# Altium PCB MainBoardPCB.PcbDoc (part 11 of 50)
Units mm, origin at the board's own origin, x right, y up, seen from the top; angles counter-clockwise.
Board outline 258.95 x 308.86 mm, 16 copper layers (L1, L2 (GND), L3 (Sign), L4 (GND), L5 (Sign), L6 (PWR/GND), L7(12V+Other), L8 (Plane_GND), L9 (PWR/GND), L10 (3V3+Other), L11 (PWR/GND), L12 (Sign), L13 (GND), L14 (Sign), L15 (GND), L16), stack 2.503 mm thick; 2578 components, 1867 nets, 8817 pads, 8021 vias.
Unrouted connection lines stored in the file: 25.
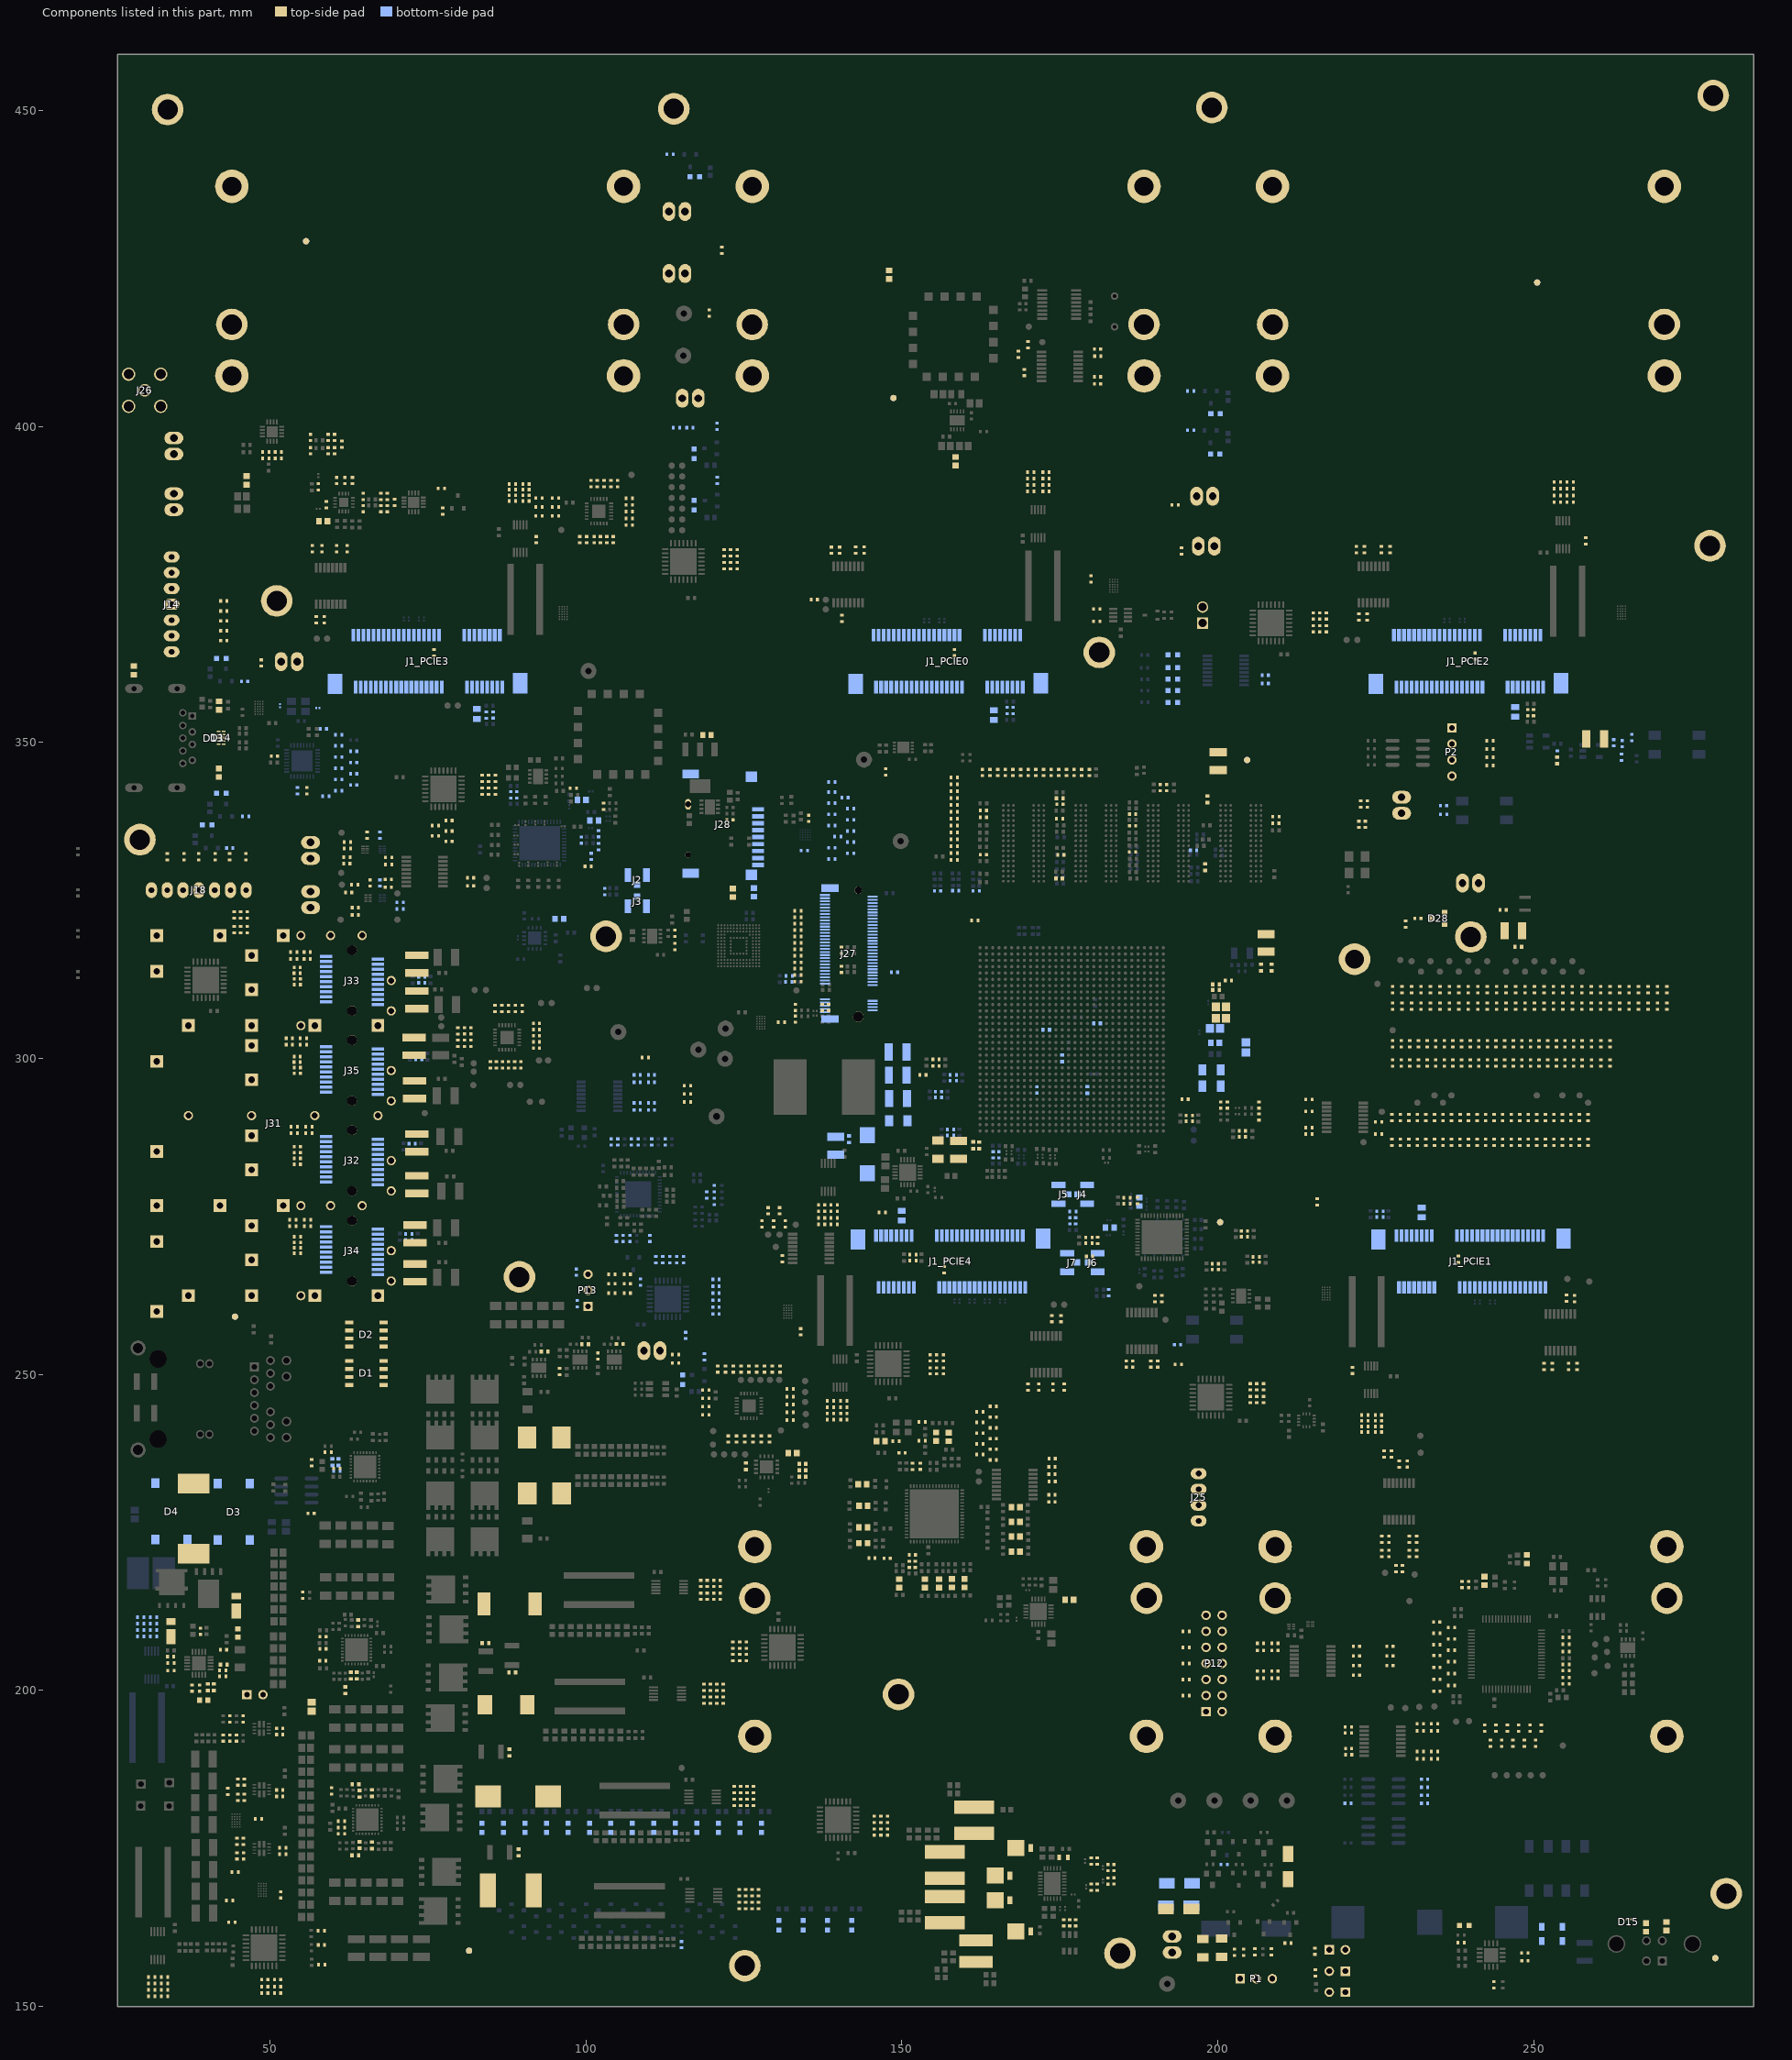
[diagram p22: the components of this part, seen from the top]

## Part data (continued)
D11 D12: "DIODE SCHOTTKY 30V 200MA SOD123", Average Rectified Current=200mA, Capacitance=10pF, Case/Package=SOD-123-2, Forward Voltage=350mV, Manufacturer="ON Semiconductor", Max Forward Surge Current (Ifsm)=600mA, Max Operating Temperature=125°C, Max Repetitive Reverse Voltage (Vrrm)=30V, Max Reverse Leakage Current=2uA, Min Operating Temperature=-55°C, Package Quantity=3000, Power Dissipation=400mW, Supplier Part Number 1=BAT54T1GOSCT-ND, Category="Rectifier Diodes", ComponentLink1Description=https://datasheet.ciiva.com/915/bat54t1-d-915482.pdf?src-supplier=Farnell, ComponentLink1URL=https://datasheet.ciiva.com/915/bat54t1-d-915482.pdf?src-supplier=Farnell, ComponentLink2Description=https://datasheet.ciiva.com/915/bat54t1-d-915482.pdf?src-supplier=Digi-Key, ComponentLink2URL=https://datasheet.ciiva.com/915/bat54t1-d-915482.pdf?src-supplier=Digi-Key, ComponentLink3Description=https://datasheet.ciiva.com/4714/bat54t1-d-108887-4714899.pdf?src-supplier=Mouser, ComponentLink3URL=https://datasheet.ciiva.com/4714/bat54t1-d-108887-4714899.pdf?src-supplier=Mouser, ComponentLink4Description=https://datasheet.ciiva.com/15144/getdatasheetpartid-39113-15144061.pdf?src-supplier=Verical, ComponentLink4URL=https://datasheet.ciiva.com/15144/getdatasheetpartid-39113-15144061.pdf?src-supplier=Verical, ComponentLink5Description=https://datasheet.ciiva.com/1180/bat54t1-d-1180308.pdf?src-supplier=Element14, ComponentLink5URL=https://datasheet.ciiva.com/1180/bat54t1-d-1180308.pdf?src-supplier=Element14, ComponentLink6Description=https://datasheet.ciiva.com/8299/bat54t1-d-8299989.pdf?src-supplier=Avnet, ComponentLink6URL=https://datasheet.ciiva.com/8299/bat54t1-d-8299989.pdf?src-supplier=Avnet, ComponentLink7Description=https://datasheet.ciiva.com/16475/bat54t1-d-16475623.pdf?src-supplier=Avnet+Asia, ComponentLink7URL=https://datasheet.ciiva.com/16475/bat54t1-d-16475623.pdf?src-supplier=Avnet+Asia, ComponentLink8Description=https://datasheet.ciiva.com/25950/bat54t1-d-25950154.pdf?src-supplier=Avnet+Europe, ComponentLink8URL=https://datasheet.ciiva.com/25950/bat54t1-d-25950154.pdf?src-supplier=Avnet+Europe, ComponentLink9Description=https://datasheet.ciiva.com/915/bat54t1-d-915483.pdf?src-supplier=Digi-Key, ComponentLink9URL=https://datasheet.ciiva.com/915/bat54t1-d-915483.pdf?src-supplier=Digi-Key, ComponentLink10Description=https://datasheet.ciiva.com/915/bat54t1-d-915484.pdf?src-supplier=Digi-Key, ComponentLink10URL=https://datasheet.ciiva.com/915/bat54t1-d-915484.pdf?src-supplier=Digi-Key, Contact Plating=Tin,Matte, Current Rating=200mA, Element Configuration=Single, Forward Current=200mA, Height=1.12mm, Lead Free="Lead Free", Length=2.69mm, Manufacturer Part Number=BAT54T1G, Max Reverse Voltage (DC)=30V, Max Surge Current=600mA, Number of Pins=2, Output Current=200mA, Packaging="Tape and Reel", Peak Non-Repetitive Surge Current=600mA, Peak Reverse Current=2uA, Polarity=Standard, Pricing 1="1=0,27000, 10=0,21700, 100=0,08880, 500=0,07410, 1000=0,05148 (USD)", Radiation Hardening=No, REACH SVHC="No SVHC", Recovery Time=5ns, Reverse Recovery Time=5ns, RoHS=Yes, Stock 1=20103, Supplier 1=Digi-Key, Termination=SMD/SMT, Voltage Rating (DC)=30V, Width=1.6mm
D13 D15: "TVS DIODE 5.5V 8V SOT3", Breakdown Voltage=9V, Capacitance=0.8pF, Case/Package=SOT, Clamping Voltage=8V, Manufacturer="Texas Instruments", Max Operating Temperature=85°C, Min Operating Temperature=-40°C, Package Quantity=1, Peak Pulse Current=1A, Peak Pulse Power=45W, Power Line Protection=Yes, Reverse Standoff Voltage=5.5V, Supplier Part Number 1=296-25509-1-ND, Test Current=1mA, Category="Interface ICs", ComponentLink1Description=https://datasheet.ciiva.com/1611/tpd2eusb30-1611602.pdf?src-supplier=Newark, ComponentLink1URL=https://datasheet.ciiva.com/1611/tpd2eusb30-1611602.pdf?src-supplier=Newark, ComponentLink2Description=https://datasheet.ciiva.com/15134/getdatasheetpartid-202713-15134479.pdf?src-supplier=Verical, ComponentLink2URL=https://datasheet.ciiva.com/15134/getdatasheetpartid-202713-15134479.pdf?src-supplier=Verical, ComponentLink3Description=https://datasheet.ciiva.com/26787/tpd2eusb30drtr-26787652.pdf?src-supplier=IIIC, ComponentLink3URL=https://datasheet.ciiva.com/26787/tpd2eusb30drtr-26787652.pdf?src-supplier=IIIC, ComponentLink4Description=https://datasheet.ciiva.com/353/tpd2eusb30-353272.pdf?src-supplier=Digi-Key, ComponentLink4URL=https://datasheet.ciiva.com/353/tpd2eusb30-353272.pdf?src-supplier=Digi-Key, ComponentLink5Description=https://datasheet.ciiva.com/1504/1882087-1504248.pdf?src-supplier=Element14, ComponentLink5URL=https://datasheet.ciiva.com/1504/1882087-1504248.pdf?src-supplier=Element14, ComponentLink6Description=https://datasheet.ciiva.com/353/tpd2eusb30-353273.pdf?src-supplier=Digi-Key, ComponentLink6URL=https://datasheet.ciiva.com/353/tpd2eusb30-353273.pdf?src-supplier=Digi-Key, ComponentLink7Description=https://datasheet.ciiva.com/25956/tpd4eusb30-25956841.pdf?src-supplier=Avnet+Europe, ComponentLink7URL=https://datasheet.ciiva.com/25956/tpd4eusb30-25956841.pdf?src-supplier=Avnet+Europe, ComponentLink8Description=https://datasheet.ciiva.com/353/tpd2eusb30-353274.pdf?src-supplier=Digi-Key, ComponentLink8URL=https://datasheet.ciiva.com/353/tpd2eusb30-353274.pdf?src-supplier=Digi-Key, Depth=0.8mm, Direction=Unidirectional,Bidirectional, Element Configuration=Dual, ESD Protection=Yes, Height=0.45mm, Interface=USB, Lead Free="Lead Free", Length=1mm, Manufacturer Part Number=TPD2EUSB30DRTR, Min Breakdown Voltage=9V, Number of Bidirectional Channels=2, Number of Channels=2, Number of Pins=3, Packaging="Tape and Reel", Pricing 1="1=0,58000, 10=0,49400, 25=0,46160, 100=0,34280, 250=0,32564, 500=0,26764, 1000=0,21754 (USD)", Radiation Hardening=No, REACH SVHC="No SVHC", RoHS=Yes, Stock 1=293674, Supplier 1=Digi-Key, Width=0.85mm, Working Voltage=5.5V
D14: "TVS DIODE 5.5V 8V 10SON", Breakdown Voltage=7V, Capacitance=0.8pF, Clamping Voltage=8V, Current Rating=5A, Manufacturer="Texas Instruments", Max Operating Temperature=85°C, Min Operating Temperature=-40°C, Package Quantity=1, Peak Pulse Current=1A, Peak Pulse Power=45W, Power Line Protection=Yes, Reverse Standoff Voltage=5.5V, Supplier Part Number 1=296-28063-1-ND, Category="TVS Diodes", ComponentLink1Description=https://datasheet.ciiva.com/339/tpd4eusb30-339202.pdf?src-supplier=Digi-Key, ComponentLink1URL=https://datasheet.ciiva.com/339/tpd4eusb30-339202.pdf?src-supplier=Digi-Key, ComponentLink2Description=https://datasheet.ciiva.com/41659/1634000-41659268.pdf?src-supplier=Farnell, ComponentLink2URL=https://datasheet.ciiva.com/41659/1634000-41659268.pdf?src-supplier=Farnell, ComponentLink3Description=https://datasheet.ciiva.com/15134/getdatasheetpartid-299321-15134669.pdf?src-supplier=Verical, ComponentLink3URL=https://datasheet.ciiva.com/15134/getdatasheetpartid-299321-15134669.pdf?src-supplier=Verical, ComponentLink4Description=https://datasheet.ciiva.com/339/tpd4eusb30-339204.pdf?src-supplier=Digi-Key, ComponentLink4URL=https://datasheet.ciiva.com/339/tpd4eusb30-339204.pdf?src-supplier=Digi-Key, ComponentLink5Description=https://datasheet.ciiva.com/1504/1882087-1504249.pdf?src-supplier=Element14, ComponentLink5URL=https://datasheet.ciiva.com/1504/1882087-1504249.pdf?src-supplier=Element14, ComponentLink6Description=https://datasheet.ciiva.com/339/tpd4eusb30-339203.pdf?src-supplier=Digi-Key, ComponentLink6URL=https://datasheet.ciiva.com/339/tpd4eusb30-339203.pdf?src-supplier=Digi-Key, ComponentLink7Description=https://datasheet.ciiva.com/22621/1882087-22621482.pdf?src-supplier=Element14, ComponentLink7URL=https://datasheet.ciiva.com/22621/1882087-22621482.pdf?src-supplier=Element14, Data Rate=6Gbps, Depth=1mm, Direction=Unidirectional, ESD Protection=Yes, Height=0.5mm, Interface=USB, Lead Free="Lead Free", Length=2.5mm, Manufacturer Part Number=TPD4EUSB30DQAR, Min Breakdown Voltage=8V, Number of Bidirectional Channels=4, Number of Channels=4, Number of Pins=10, Packaging="Tape and Reel", Pricing 1="1=0,81000, 10=0,71400, 25=0,67040, 100=0,48670, 250=0,46936, 500=0,40664, 1000=0,34608 (USD)", Radiation Hardening=No, REACH SVHC="No SVHC", RoHS=Yes, Stock 1=69157, Supplier 1=Digi-Key, Termination=SMD/SMT, Width=1.1mm, Working Voltage=5.5V
D16 D17 D18 D19: library part MBRM140T1G, Supplier Part Number 1=MBRM140T3GOSCT-ND, Supplier 1=Digi-Key
D20 D21 D23 D24: "DIODE GEN PURP 1KV 1A SMA", Average Rectified Current=1A, Capacitance=10pF, Case/Package=SMA, Forward Voltage="Vf = 1.1V", Manufacturer=Diodes, Max Forward Surge Current (Ifsm)=30A, Max Operating Temperature=150°C, Max Repetitive Reverse Voltage (Vrrm)=1kV, Min Operating Temperature=-65°C, Package Quantity=5000, Peak Reverse Current=5uA, Supplier Part Number 1=S1M-FDICT-ND, Category="Rectifier Diodes", ComponentLink1Description=https://datasheet.ciiva.com/34302/1541642-34302418.pdf?src-supplier=Jameco, ComponentLink1URL=https://datasheet.ciiva.com/34302/1541642-34302418.pdf?src-supplier=Jameco, ComponentLink2Description=https://datasheet.ciiva.com/22695/1911706-22695834.pdf?src-supplier=Element14, ComponentLink2URL=https://datasheet.ciiva.com/22695/1911706-22695834.pdf?src-supplier=Element14, Current Rating=1A, Forward Current=1A, Height=2.1mm, Lead Free="Lead Free", Length=4.6mm, Manufacturer Part Number=S1M-13-F, Max Reverse Voltage (DC)=1kV, Number of Pins=2, Output Current=1A, Packaging="Tape and Reel", Peak Non-Repetitive Surge Current=30A, Polarity=Standard, Pricing 1="1=0,25000, 10=0,20100, 25=0,16840, 100=0,08240, 250=0,08104, 500=0,06870, 1000=0,04774, 2500=0,04437 (USD)", Radiation Hardening=No, REACH SVHC="No SVHC", Recovery Time=1.8us, Reverse Recovery Time=3us, Reverse Voltage (DC)=1kV, RoHS=Yes, Stock 1=1021310, Supplier 1=Digi-Key, Termination=SMD/SMT, Voltage Rating (DC)=1kV, Weight=0.002258oz, Width=2.92mm
D22 D25 D29 D30 D31 D32 D33 D34 D35 D36 D37 D38 D39 D40 D41 D42 D43 D44 D45 D46 D47 D48 D49 D50 D51 D52 D53: "LED,  LTST-C190GKT", Case Code (Imperial)=0603, Case Code (Metric)=1608, Color=Green, Forward Current=30mA, Forward Voltage=2.1V, Lens Color=Colorless, Manufacturer 1="Vishay Lite-On", Max Operating Temperature=85°C, Min Operating Temperature=-55°C, Package Quantity=1, Power Dissipation=100mW, Reverse Voltage=5V, Supplier Part Number 1=160-1183-1-ND, Test Current=10mA, Voltage=2V, Case/Package=0603, ComponentLink1Description=https://datasheet.ciiva.com/11775/0900766b80dc02a6-11775616.pdf?src-supplier=RSComponents, ComponentLink1URL=https://datasheet.ciiva.com/11775/0900766b80dc02a6-11775616.pdf?src-supplier=RSComponents, ComponentLink2Description=https://datasheet.ciiva.com/2109/ltst-c190gkt-2109985.pdf?src-supplier=Digi-Key, ComponentLink2URL=https://datasheet.ciiva.com/2109/ltst-c190gkt-2109985.pdf?src-supplier=Digi-Key, ComponentLink3Description=https://datasheet.ciiva.com/16392/lite-on20ltst-c190gkt-16392818.pdf?src-supplier=Future+Electronics, ComponentLink3URL=https://datasheet.ciiva.com/16392/lite-on20ltst-c190gkt-16392818.pdf?src-supplier=Future+Electronics, ComponentLink4Description=https://datasheet.ciiva.com/12403/lite-on-ltst-c190gkt-187204-12403884.pdf?src-supplier=Mouser, ComponentLink4URL=https://datasheet.ciiva.com/12403/lite-on-ltst-c190gkt-187204-12403884.pdf?src-supplier=Mouser, ComponentLink5Description=https://datasheet.ciiva.com/2109/ltst-c190gkt-2109986.pdf?src-supplier=Digi-Key, ComponentLink5URL=https://datasheet.ciiva.com/2109/ltst-c190gkt-2109986.pdf?src-supplier=Digi-Key, ComponentLink6Description=https://datasheet.ciiva.com/2109/ltst-c190gkt-2109987.pdf?src-supplier=Digi-Key, ComponentLink6URL=https://datasheet.ciiva.com/2109/ltst-c190gkt-2109987.pdf?src-supplier=Digi-Key, Depth=0.8mm, Dominant Wavelength=569nm, Height=0.8mm, Illumination Color=Green, Lead Free="Lead Free", Length=1.6mm, Lens Style=Clear,Diffused,Colorless,Rectangular, Lens Transparency=Clear, Luminous Intensity=6mcd, Manufacturer Part Number 1=LTST-C190GKT, Mount="Surface Mount", Number of Elements=1, Number of LEDs=1, Number of Pins=2, Packaging="Tape and Reel", Power Rating=100mW, Pricing 1="1=0.26000, 10=0.18800, 100=0.08880, 500=0.05922, 1000=0.04639 (USD)", Radiation Hardening=No, RoHS=Yes, Stock 1=908158, Supplier 1=Digi-Key, Viewing Angle=130°, Wavelength=565nm, Width=0.8mm
D26 D27: "DIODE SCHOTTKY 100V POWERDI123", Average Rectified Current=1A, Capacitance=36pF, Forward Voltage=770mV, Manufacturer=Diodes, Max Forward Surge Current (Ifsm)=40A, Max Operating Temperature=175°C, Max Repetitive Reverse Voltage (Vrrm)=100V, Min Operating Temperature=-55°C, Package Quantity=3000, Peak Non-Repetitive Surge Current=50A, Peak Reverse Current=1uA, Supplier Part Number 1=DFLS1100DICT-ND, Category="Rectifier Diodes", ComponentLink1Description=https://datasheet.ciiva.com/6932/ds30497-6932064.pdf?src-supplier=Newark, ComponentLink1URL=https://datasheet.ciiva.com/6932/ds30497-6932064.pdf?src-supplier=Newark, ComponentLink2Description=https://datasheet.ciiva.com/4715/ds30497-81105-4715653.pdf?src-supplier=Mouser, ComponentLink2URL=https://datasheet.ciiva.com/4715/ds30497-81105-4715653.pdf?src-supplier=Mouser, ComponentLink3Description=https://datasheet.ciiva.com/4245/2460ds30497-4245287.pdf?src-supplier=Arrow, ComponentLink3URL=https://datasheet.ciiva.com/4245/2460ds30497-4245287.pdf?src-supplier=Arrow, ComponentLink4Description=https://datasheet.ciiva.com/15144/getdatasheetpartid-44146-15144126.pdf?src-supplier=Verical, ComponentLink4URL=https://datasheet.ciiva.com/15144/getdatasheetpartid-44146-15144126.pdf?src-supplier=Verical, ComponentLink5Description=https://datasheet.ciiva.com/26788/dfls1100-7-26788776.pdf?src-supplier=IIIC, ComponentLink5URL=https://datasheet.ciiva.com/26788/dfls1100-7-26788776.pdf?src-supplier=IIIC, ComponentLink6Description=https://datasheet.ciiva.com/914/ds30497-914548.pdf?src-supplier=Digi-Key, ComponentLink6URL=https://datasheet.ciiva.com/914/ds30497-914548.pdf?src-supplier=Digi-Key, ComponentLink7Description=https://datasheet.ciiva.com/914/ds30497-914549.pdf?src-supplier=Digi-Key, ComponentLink7URL=https://datasheet.ciiva.com/914/ds30497-914549.pdf?src-supplier=Digi-Key, ComponentLink8Description=https://datasheet.ciiva.com/914/ds30497-914550.pdf?src-supplier=Digi-Key, ComponentLink8URL=https://datasheet.ciiva.com/914/ds30497-914550.pdf?src-supplier=Digi-Key, ComponentLink9Description=https://datasheet.ciiva.com/7964/ds30497-7964246.pdf?src-supplier=Element14, ComponentLink9URL=https://datasheet.ciiva.com/7964/ds30497-7964246.pdf?src-supplier=Element14, ComponentLink10Description=https://datasheet.ciiva.com/22695/1915475-22695803.pdf?src-supplier=Element14, ComponentLink10URL=https://datasheet.ciiva.com/22695/1915475-22695803.pdf?src-supplier=Element14, Current Rating=1A, Element Configuration=Single, Forward Current=1A, Height=0.98mm, Lead Free="Lead Free", Length=2.8mm, Manufacturer Part Number=DFLS1100-7, Max Reverse Voltage (DC)=100V, Mount="Surface Mount", Number of Pins=2, Output Current=1A, Packaging="Tape and Reel", Polarity=Standard, Pricing 1="1=0,41000, 10=0,35100, 25=0,32760, 100=0,24340, 250=0,23120, 500=0,19000, 1000=0,15444 (USD)", Radiation Hardening=No, REACH SVHC="No SVHC", RoHS=Yes, Stock 1=113187, Supplier 1=Digi-Key, Termination=SMD/SMT, Voltage Rating (DC)=100V, Width=1.78mm
D28: "DIODE ARRAY SCHOTTKY 40V SOT23", Average Rectified Current=200mA, Capacitance=5pF, Case/Package=SOT-23, Forward Voltage=1V, Manufacturer=MCC, Max Forward Surge Current (Ifsm)=600mA, Max Operating Temperature=125°C, Max Repetitive Reverse Voltage (Vrrm)=40V, Max Reverse Leakage Current=200nA, Min Operating Temperature=-55°C, Package Quantity=3000, Power Dissipation=200mW, Supplier Part Number 1=BAS40-04TPMSCT-ND, ComponentLink1Description=https://datasheet.ciiva.com/23684/1684803-23684306.pdf?src-supplier=Newark, ComponentLink1URL=https://datasheet.ciiva.com/23684/1684803-23684306.pdf?src-supplier=Newark, ComponentLink2Description=https://datasheet.ciiva.com/4716/bas40-bas70sot-23-28891-4716000.pdf?src-supplier=Mouser, ComponentLink2URL=https://datasheet.ciiva.com/4716/bas40-bas70sot-23-28891-4716000.pdf?src-supplier=Mouser, ComponentLink3Description=https://datasheet.ciiva.com/906/bas40-bas70sot-23-906320.pdf?src-supplier=Digi-Key, ComponentLink3URL=https://datasheet.ciiva.com/906/bas40-bas70sot-23-906320.pdf?src-supplier=Digi-Key, ComponentLink4Description=https://datasheet.ciiva.com/15200/getdatasheetpartid-226544-15200426.pdf?src-supplier=Verical, ComponentLink4URL=https://datasheet.ciiva.com/15200/getdatasheetpartid-226544-15200426.pdf?src-supplier=Verical, ComponentLink5Description=https://datasheet.ciiva.com/7624/1684803-7624699.pdf?src-supplier=Element14, ComponentLink5URL=https://datasheet.ciiva.com/7624/1684803-7624699.pdf?src-supplier=Element14, ComponentLink6Description=https://datasheet.ciiva.com/906/bas40-bas70sot-23-906318.pdf?src-supplier=Digi-Key, ComponentLink6URL=https://datasheet.ciiva.com/906/bas40-bas70sot-23-906318.pdf?src-supplier=Digi-Key, ComponentLink7Description=https://datasheet.ciiva.com/906/bas40-bas70sot-23-906319.pdf?src-supplier=Digi-Key, ComponentLink7URL=https://datasheet.ciiva.com/906/bas40-bas70sot-23-906319.pdf?src-supplier=Digi-Key, Element Configuration=Single, Forward Current=200mA, Height=1.02mm, Lead Free="Lead Free", Length=3.04mm, Manufacturer Part Number=BAS40-04-TP, Max Reverse Voltage (DC)=40V, Max Surge Current=600mA, Mount="Surface Mount", Number of Pins=3, Packaging="Tape and Reel", Peak Non-Repetitive Surge Current=600mA, Peak Reverse Current=200nA, Pricing 1="1 = 0,39000, 10 = 0,28800, 25 = 0,25240, 100 = 0,13700, 250 = 0,13628, 500 = 0,11176, 1000 = 0,08292 (USD)", Radiation Hardening=No, REACH SVHC=Unknown, Recovery Time=5ns, Reverse Recovery Time=5ns, RoHS=Yes, Stock 1=1204011, Supplier 1=Digi-Key, Width=1.4mm
F1_PCIE0 F1_PCIE1 F1_PCIE2 F1_PCIE3 F1_PCIE4: library part Resistor, "FUSE BOARD MNT 500MA 32VDC 0805", Case/Package=SMD/SMT, Case Code (Imperial)=0805, Case Code (Metric)=2012, Current Rating=500mA, DC Cold Resistance=570mR, Manufacturer=Vishay, Manufacturer Part Number=MFU0805FF00500P100, Max Operating Temperature=125°C, Min Operating Temperature=-55°C, Package Quantity=1000, Supplier Part Number 1=MFU0805.50CT-ND, Voltage Rating (DC)=32V, Approvals=UL, Category=Fuses, ComponentLink1Description=https://datasheet.ciiva.com/7650/mfuserie-7650777.pdf?src-supplier=Element14, ComponentLink1URL=https://datasheet.ciiva.com/7650/mfuserie-7650777.pdf?src-supplier=Element14, ComponentLink2Description=https://datasheet.ciiva.com/16393/mfuserie-16393883.pdf?src-supplier=Future+Electronics, ComponentLink2URL=https://datasheet.ciiva.com/16393/mfuserie-16393883.pdf?src-supplier=Future+Electronics, ComponentLink3Description=https://datasheet.ciiva.com/8057/1480005-8057902.pdf?src-supplier=Element14, ComponentLink3URL=https://datasheet.ciiva.com/8057/1480005-8057902.pdf?src-supplier=Element14, ComponentLink4Description=https://datasheet.ciiva.com/11337/mfuserie-11337759.pdf?src-supplier=Avnet, ComponentLink4URL=https://datasheet.ciiva.com/11337/mfuserie-11337759.pdf?src-supplier=Avnet, Depth=1.25mm, Fuse Current=500mA, Fuse Type="Board Mount (Cartridge Style Excluded)", Height=0.018inch, Housing Material=Ceramic, Length=0.079inch, Mount="Surface Mount", Number of Pins=2, Packaging="Tape and Reel", Pricing 1="1=0,63000, 5=0,60800, 10=0,58900, 50=0,49560, 100=0,41140, 250=0,37400, 500=0,31790 (USD)", Radiation Hardening=No, REACH SVHC="No SVHC", RoHS=Yes, Stock 1=14752, Supplier 1=Digi-Key, Width=0.049inch, Working Voltage=32V
FB3 FB5 FB6 FB7 FB26 FB27 FB28 FB29 FB31 FB32 FB35 FB43 FB44: library part Ferrite, "FERRITE BEAD 220 OHM 0603 1LN", Case/Package=0603, Case Code (Metric)=1608, Current Rating=2.5A, DC Resistance (DCR)=40mR, Manufacturer=Murata, Manufacturer Part Number=BLM18SG221TN1D, Max Operating Temperature=125°C, Min Operating Temperature=-55°C, Package Quantity=1, Supplier Part Number 1=490-5225-1-ND, Test Frequency=100MHz, Tolerance=25%, Case Code (Imperial)=0603, Category=Inductors, ComponentLink1Description=https://datasheet.ciiva.com/1561/c31e-1561456.pdf?src-supplier=Newark, ComponentLink1URL=https://datasheet.ciiva.com/1561/c31e-1561456.pdf?src-supplier=Newark, ComponentLink2Description=https://datasheet.ciiva.com/41449/001171724-da-01-en-chip-drossel0603-220r-2500ma-1-6x0-8mm-41449352.pdf?src-supplier=Conrad, ComponentLink2URL=https://datasheet.ciiva.com/41449/001171724-da-01-en-chip-drossel0603-220r-2500ma-1-6x0-8mm-41449352.pdf?src-supplier=Conrad, ComponentLink3Description=https://datasheet.ciiva.com/41449/001172313-da-01-en-drossel-0603-220r-21-6x0-8mm-10000st-41449677.pdf?src-supplier=Conrad, ComponentLink3URL=https://datasheet.ciiva.com/41449/001172313-da-01-en-drossel-0603-220r-21-6x0-8mm-10000st-41449677.pdf?src-supplier=Conrad, ComponentLink4Description=https://datasheet.ciiva.com/1012/l0110s0100blm18s-1012626.pdf?src-supplier=Digi-Key, ComponentLink4URL=https://datasheet.ciiva.com/1012/l0110s0100blm18s-1012626.pdf?src-supplier=Digi-Key, ComponentLink5Description=https://datasheet.ciiva.com/1012/l0110s0100blm18s-1012627.pdf?src-supplier=Digi-Key, ComponentLink5URL=https://datasheet.ciiva.com/1012/l0110s0100blm18s-1012627.pdf?src-supplier=Digi-Key, ComponentLink6Description=https://datasheet.ciiva.com/1012/l0110s0100blm18s-1012628.pdf?src-supplier=Digi-Key, ComponentLink6URL=https://datasheet.ciiva.com/1012/l0110s0100blm18s-1012628.pdf?src-supplier=Digi-Key, ComponentLink7Description=https://datasheet.ciiva.com/17279/l0110s0100blm18s-17279573.pdf?src-supplier=Avnet+Europe, ComponentLink7URL=https://datasheet.ciiva.com/17279/l0110s0100blm18s-17279573.pdf?src-supplier=Avnet+Europe, ComponentLink8Description=https://datasheet.ciiva.com/8508/l0110s0100blm18s-8508310.pdf?src-supplier=Avnet, ComponentLink8URL=https://datasheet.ciiva.com/8508/l0110s0100blm18s-8508310.pdf?src-supplier=Avnet, ComponentLink9Description=https://datasheet.ciiva.com/8021/5151-8021517.pdf?src-supplier=Element14, ComponentLink9URL=https://datasheet.ciiva.com/8021/5151-8021517.pdf?src-supplier=Element14, ComponentLink10Description=https://datasheet.ciiva.com/16204/l0110s0100blm18s-16204029.pdf?src-supplier=Future+Electronics, ComponentLink10URL=https://datasheet.ciiva.com/16204/l0110s0100blm18s-16204029.pdf?src-supplier=Future+Electronics, ComponentLink11Description=https://datasheet.ciiva.com/14122/blm-series-eng-tds-14122910.pdf?src-supplier=Distrelec, ComponentLink11URL=https://datasheet.ciiva.com/14122/blm-series-eng-tds-14122910.pdf?src-supplier=Distrelec, ComponentLink12Description=https://datasheet.ciiva.com/8021/5151-8021519.pdf?src-supplier=Element14, ComponentLink12URL=https://datasheet.ciiva.com/8021/5151-8021519.pdf?src-supplier=Element14, Core Material=Ferrite, DC Current=2.5A, Depth=0.95mm, Height=0.8mm, Impedance=220R, Lead Free="Lead Free", Length=1.6mm, Material=Ferrite,Steel, Max Current Rating=2.5A, Max DC Current=2.5A, Number of Circuits=1, Number of Lines=1, Number of Pins=2, Packaging="Tape and Reel", Pricing 1="1=0,14000, 10=0,11600, 25=0,09040, 50=0,07500, 100=0,06460, 250=0,05172, 500=0,04654, 1000=0,03878, 5000=0,03619 (USD)", Radiation Hardening=No, REACH SVHC="No SVHC", RoHS=Yes, Stock 1=123623, Supplier 1=Digi-Key, Termination=SMD/SMT, Weight=7.1E-05oz, Width=0.8mm
FB8 FB9 FB10 FB11 FB12 FB13 FB14 FB15 FB16 FB17 FB18 FB19 FB20 FB21 FB22 FB36 FB37: library part Ferrite, "FERRITE BEAD 220 OHM 0603 1LN", Case Code (Imperial)=0603, Case Code (Metric)=1608, Current Rating=2.5A, DC Resistance (DCR)=40mR, Manufacturer=Murata, Manufacturer Part Number=BLM18SG221TN1D, Max Operating Temperature=125°C, Min Operating Temperature=-55°C, Package Quantity=1, Supplier Part Number 1=490-5225-1-ND, Test Frequency=100MHz, Tolerance=25%, Case/Package=0603, Category=Inductors, ComponentLink1Description=https://datasheet.ciiva.com/1561/c31e-1561456.pdf?src-supplier=Newark, ComponentLink1URL=https://datasheet.ciiva.com/1561/c31e-1561456.pdf?src-supplier=Newark, ComponentLink2Description=https://datasheet.ciiva.com/41449/001171724-da-01-en-chip-drossel0603-220r-2500ma-1-6x0-8mm-41449352.pdf?src-supplier=Conrad, ComponentLink2URL=https://datasheet.ciiva.com/41449/001171724-da-01-en-chip-drossel0603-220r-2500ma-1-6x0-8mm-41449352.pdf?src-supplier=Conrad, ComponentLink3Description=https://datasheet.ciiva.com/41449/001172313-da-01-en-drossel-0603-220r-21-6x0-8mm-10000st-41449677.pdf?src-supplier=Conrad, ComponentLink3URL=https://datasheet.ciiva.com/41449/001172313-da-01-en-drossel-0603-220r-21-6x0-8mm-10000st-41449677.pdf?src-supplier=Conrad, ComponentLink4Description=https://datasheet.ciiva.com/1012/l0110s0100blm18s-1012626.pdf?src-supplier=Digi-Key, ComponentLink4URL=https://datasheet.ciiva.com/1012/l0110s0100blm18s-1012626.pdf?src-supplier=Digi-Key, ComponentLink5Description=https://datasheet.ciiva.com/1012/l0110s0100blm18s-1012627.pdf?src-supplier=Digi-Key, ComponentLink5URL=https://datasheet.ciiva.com/1012/l0110s0100blm18s-1012627.pdf?src-supplier=Digi-Key, ComponentLink6Description=https://datasheet.ciiva.com/1012/l0110s0100blm18s-1012628.pdf?src-supplier=Digi-Key, ComponentLink6URL=https://datasheet.ciiva.com/1012/l0110s0100blm18s-1012628.pdf?src-supplier=Digi-Key, ComponentLink7Description=https://datasheet.ciiva.com/17279/l0110s0100blm18s-17279573.pdf?src-supplier=Avnet+Europe, ComponentLink7URL=https://datasheet.ciiva.com/17279/l0110s0100blm18s-17279573.pdf?src-supplier=Avnet+Europe, ComponentLink8Description=https://datasheet.ciiva.com/8508/l0110s0100blm18s-8508310.pdf?src-supplier=Avnet, ComponentLink8URL=https://datasheet.ciiva.com/8508/l0110s0100blm18s-8508310.pdf?src-supplier=Avnet, ComponentLink9Description=https://datasheet.ciiva.com/8021/5151-8021517.pdf?src-supplier=Element14, ComponentLink9URL=https://datasheet.ciiva.com/8021/5151-8021517.pdf?src-supplier=Element14, ComponentLink10Description=https://datasheet.ciiva.com/16204/l0110s0100blm18s-16204029.pdf?src-supplier=Future+Electronics, ComponentLink10URL=https://datasheet.ciiva.com/16204/l0110s0100blm18s-16204029.pdf?src-supplier=Future+Electronics, ComponentLink11Description=https://datasheet.ciiva.com/14122/blm-series-eng-tds-14122910.pdf?src-supplier=Distrelec, ComponentLink11URL=https://datasheet.ciiva.com/14122/blm-series-eng-tds-14122910.pdf?src-supplier=Distrelec, ComponentLink12Description=https://datasheet.ciiva.com/8021/5151-8021519.pdf?src-supplier=Element14, ComponentLink12URL=https://datasheet.ciiva.com/8021/5151-8021519.pdf?src-supplier=Element14, Core Material=Ferrite, DC Current=2.5A, Depth=0.95mm, Height=0.8mm, Impedance=220R, Lead Free="Lead Free", Length=1.6mm, Material=Ferrite,Steel, Max Current Rating=2.5A, Max DC Current=2.5A, Number of Circuits=1, Number of Lines=1, Number of Pins=2, Packaging="Tape and Reel", Pricing 1="1=0,14000, 10=0,11600, 25=0,09040, 50=0,07500, 100=0,06460, 250=0,05172, 500=0,04654, 1000=0,03878, 5000=0,03619 (USD)", Radiation Hardening=No, REACH SVHC="No SVHC", RoHS=Yes, Stock 1=123623, Supplier 1=Digi-Key, Termination=SMD/SMT, Weight=7.1E-05oz, Width=0.8mm
FB23 FB25: "SMT Ferrite Chip", Case/Package=0603, Case Code (Metric)=1608, Current Rating=1.7A, DC Resistance (DCR)=80mR, Manufacturer=TDK, Manufacturer Part Number=MPZ1608S331ATA00, Package Quantity=1, Supplier Part Number 1=445-5221-1-ND, Tolerance=25%, Case Code (Imperial)=0603, ComponentLink1Description=https://datasheet.ciiva.com/46634/beads-commercial-power-mpz-en-46634727.pdf?src-supplier=Digi-Key, ComponentLink1URL=https://datasheet.ciiva.com/46634/beads-commercial-power-mpz-en-46634727.pdf?src-supplier=Digi-Key, ComponentLink2Description=https://datasheet.ciiva.com/46634/beads-commercial-power-mpz-en-46634696.pdf?src-supplier=Digi-Key, ComponentLink2URL=https://datasheet.ciiva.com/46634/beads-commercial-power-mpz-en-46634696.pdf?src-supplier=Digi-Key, ComponentLink3Description=https://datasheet.ciiva.com/46634/beads-commercial-power-mpz-en-46634731.pdf?src-supplier=Digi-Key, ComponentLink3URL=https://datasheet.ciiva.com/46634/beads-commercial-power-mpz-en-46634731.pdf?src-supplier=Digi-Key, Core Material=Ferrite, Height=0.037inch, Impedance=330R, Lead Free="Lead Free", Length=0.063inch, Max DC Current=1.7A, Mount="Surface Mount", Packaging="Tape and Reel", Pricing 1="1 = 0,10000, 10 = 0,07900, 25 = 0,07160, 50 = 0,06440, 100 = 0,04720, 250 = 0,03432, 500 = 0,03146, 1000 = 0,02717 (USD)", REACH SVHC="No SVHC", RoHS=Yes, Stock 1=117126, Supplier 1=Digi-Key, Width=0.031inch
FB24: "SMT Ferrite Chip", Case Code (Imperial)=0603, Case Code (Metric)=1608, Current Rating=1.7A, DC Resistance (DCR)=80mR, Manufacturer=TDK, Manufacturer Part Number=MPZ1608S331ATA00, Package Quantity=1, Supplier Part Number 1=445-5221-1-ND, Tolerance=25%, Case/Package=0603, ComponentLink1Description=https://datasheet.ciiva.com/46634/beads-commercial-power-mpz-en-46634727.pdf?src-supplier=Digi-Key, ComponentLink1URL=https://datasheet.ciiva.com/46634/beads-commercial-power-mpz-en-46634727.pdf?src-supplier=Digi-Key, ComponentLink2Description=https://datasheet.ciiva.com/46634/beads-commercial-power-mpz-en-46634696.pdf?src-supplier=Digi-Key, ComponentLink2URL=https://datasheet.ciiva.com/46634/beads-commercial-power-mpz-en-46634696.pdf?src-supplier=Digi-Key, ComponentLink3Description=https://datasheet.ciiva.com/46634/beads-commercial-power-mpz-en-46634731.pdf?src-supplier=Digi-Key, ComponentLink3URL=https://datasheet.ciiva.com/46634/beads-commercial-power-mpz-en-46634731.pdf?src-supplier=Digi-Key, Core Material=Ferrite, Height=0.037inch, Impedance=330R, Lead Free="Lead Free", Length=0.063inch, Max DC Current=1.7A, Mount="Surface Mount", Packaging="Tape and Reel", Pricing 1="1 = 0,10000, 10 = 0,07900, 25 = 0,07160, 50 = 0,06440, 100 = 0,04720, 250 = 0,03432, 500 = 0,03146, 1000 = 0,02717 (USD)", REACH SVHC="No SVHC", RoHS=Yes, Stock 1=117126, Supplier 1=Digi-Key, Width=0.031inch
FB33 FB45: library part Ferrite, "Ind Chip Bead 120Ohm 25% 100MHz Ferrite 3A 0603 Paper T/R", Case/Package=0603, Case Code (Metric)=1608, Current Rating=3A, DC Resistance (DCR)=25mR, Frequency=100MHz, Manufacturer=Murata, Manufacturer Part Number=BLM18SG121TN1D, Max Operating Temperature=125°C, Min Operating Temperature=-55°C, Package Quantity=1, Supplier Part Number 1=1515752, Tolerance=25%, Case Code (Imperial)=0603, Category="Ferrite Beads and Chips", ComponentLink1Description=https://datasheet.ciiva.com/1012/l0110s0100blm18s-1012624.pdf?src-supplier=Digi-Key, ComponentLink1URL=https://datasheet.ciiva.com/1012/l0110s0100blm18s-1012624.pdf?src-supplier=Digi-Key, ComponentLink2Description=https://datasheet.ciiva.com/18093/getdatasheetpartid-295885-18093249.pdf?src-supplier=Verical, ComponentLink2URL=https://datasheet.ciiva.com/18093/getdatasheetpartid-295885-18093249.pdf?src-supplier=Verical, ComponentLink3Description=https://datasheet.ciiva.com/11799/0900766b811b5866-11799181.pdf?src-supplier=RSComponents, ComponentLink3URL=https://datasheet.ciiva.com/11799/0900766b811b5866-11799181.pdf?src-supplier=RSComponents, ComponentLink4Description=https://datasheet.ciiva.com/41449/001171723-da-01-en-chip-drossel0603-120r-3000ma-1-6x0-8mm-41449353.pdf?src-supplier=Conrad, ComponentLink4URL=https://datasheet.ciiva.com/41449/001171723-da-01-en-chip-drossel0603-120r-3000ma-1-6x0-8mm-41449353.pdf?src-supplier=Conrad, ComponentLink5Description=https://datasheet.ciiva.com/41449/001172312-da-01-en-drossel-0603-120r-1-6x0-8mm-10000st-41449675.pdf?src-supplier=Conrad, ComponentLink5URL=https://datasheet.ciiva.com/41449/001172312-da-01-en-drossel-0603-120r-1-6x0-8mm-10000st-41449675.pdf?src-supplier=Conrad, ComponentLink6Description=https://datasheet.ciiva.com/1012/l0110s0100blm18s-1012625.pdf?src-supplier=Digi-Key, ComponentLink6URL=https://datasheet.ciiva.com/1012/l0110s0100blm18s-1012625.pdf?src-supplier=Digi-Key, ComponentLink7Description=https://datasheet.ciiva.com/8021/5151-8021511.pdf?src-supplier=Element14, ComponentLink7URL=https://datasheet.ciiva.com/8021/5151-8021511.pdf?src-supplier=Element14, ComponentLink8Description=https://datasheet.ciiva.com/8021/5151-8021512.pdf?src-supplier=Element14, ComponentLink8URL=https://datasheet.ciiva.com/8021/5151-8021512.pdf?src-supplier=Element14, ComponentLink9Description=https://datasheet.ciiva.com/14122/blm-series-eng-tds-14122906.pdf?src-supplier=Distrelec, ComponentLink9URL=https://datasheet.ciiva.com/14122/blm-series-eng-tds-14122906.pdf?src-supplier=Distrelec, ComponentLink10Description=https://datasheet.ciiva.com/16395/l0110s0100blm18s-16395498.pdf?src-supplier=Future+Electronics, ComponentLink10URL=https://datasheet.ciiva.com/16395/l0110s0100blm18s-16395498.pdf?src-supplier=Future+Electronics, ComponentLink11Description=https://datasheet.ciiva.com/1012/l0110s0100blm18s-1012623.pdf?src-supplier=Digi-Key, ComponentLink11URL=https://datasheet.ciiva.com/1012/l0110s0100blm18s-1012623.pdf?src-supplier=Digi-Key, ComponentLink12Description=https://datasheet.ciiva.com/17246/l0110s0100blm18s-17246943.pdf?src-supplier=Avnet+Europe, ComponentLink12URL=https://datasheet.ciiva.com/17246/l0110s0100blm18s-17246943.pdf?src-supplier=Avnet+Europe, Core Material=Ferrite, Depth=0.8mm, Height=0.8mm, Impedance=120R, Lead Free="Lead Free", Length=1.6mm, Material=Steel,Ferrite, Max Current Rating=3A, Max DC Current=3A, Number of Circuits=1, Number of Lines=1, Number of Pins=2, Packaging="Tape and Reel", REACH SVHC="No SVHC", RoHS=Yes, Shielding=Unshielded, Stock 1=47191, Supplier 1=Farnell, Termination=SMD/SMT, Test Frequency=100MHz, Width=0.8mm
FB34: library part Ferrite, "Ferrite Beads Power Chip 330Ohm 25% 100MHz 800mA 210mOhm DCR 0603 Automotive T/R", Case Code (Imperial)=0603, Case Code (Metric)=1608, DC Resistance (DCR)=210mR, Frequency=100MHz, Manufacturer="Taiyo Yuden", Manufacturer Part Number=FBMH1608HL331-T, Max Current Rating=800mA, Max DC Current=600mA, Max Operating Temperature=125°C, Min Operating Temperature=-40°C, Package Quantity=1, Supplier Part Number 1=587-1734-1-ND, Tolerance=25%, Case/Package=0603, Category="Ferrite Beads and Chips", ComponentLink1Description=https://datasheet.ciiva.com/1012/fbmh1608hl331-t-ss-1012496.pdf?src-supplier=Digi-Key, ComponentLink1URL=https://datasheet.ciiva.com/1012/fbmh1608hl331-t-ss-1012496.pdf?src-supplier=Digi-Key, ComponentLink2Description=https://datasheet.ciiva.com/25614/0900766b810b37be-25614404.pdf?src-supplier=RSComponents, ComponentLink2URL=https://datasheet.ciiva.com/25614/0900766b810b37be-25614404.pdf?src-supplier=RSComponents, ComponentLink3Description=https://datasheet.ciiva.com/1012/chipbeads01-e-1012495.pdf?src-supplier=Digi-Key, ComponentLink3URL=https://datasheet.ciiva.com/1012/chipbeads01-e-1012495.pdf?src-supplier=Digi-Key, ComponentLink4Description=https://datasheet.ciiva.com/1012/chipbeads01-e-1012494.pdf?src-supplier=Digi-Key, ComponentLink4URL=https://datasheet.ciiva.com/1012/chipbeads01-e-1012494.pdf?src-supplier=Digi-Key, Composition="Ferrite Bead", Core Material=Ferrite, Depth=0.95mm, Halogen Free="Halogen Free", Height=0.8mm, Impedance=330R, Lead Free="Lead Free", Length=1.6mm, Material=Ferrite, Mount="Surface Mount", Number of Lines=1, Number of Pins=2, Packaging="Tape and Reel", Pricing 1="1=0,11000, 10=0,09400, 25=0,07320, 50=0,06060, 100=0,05230, 250=0,04180, 500=0,03762, 1000=0,03135 (USD)", RoHS=Yes, Shielding=Unshielded, Stock 1=4788, Supplier 1=Digi-Key, Termination=SMD/SMT, Test Frequency=100MHz, Width=0.031inch
FB38 FB39 FB40 FB41: library part Ferrite, "FERRITE BEAD 600 OHM 0805 1LN", Case Code (Imperial)=0805, Case Code (Metric)=2012, Current Rating=500mA, DC Resistance (DCR)=300mR, Frequency=100MHz, Manufacturer=Laird, Manufacturer Part Number=HZ0805E601R-10, Max Operating Temperature=125°C, Min Operating Temperature=-40°C, Package Quantity=1, Supplier Part Number 1=240-2399-1-ND, Case/Package=0805, Category="Fixed Inductors", ComponentLink1Description=https://datasheet.ciiva.com/22622/1685710-22622833.pdf?src-supplier=Element14, ComponentLink1URL=https://datasheet.ciiva.com/22622/1685710-22622833.pdf?src-supplier=Element14, ComponentLink2Description=https://datasheet.ciiva.com/1013/hz0805e601r-10-1013170.pdf?src-supplier=Digi-Key, ComponentLink2URL=https://datasheet.ciiva.com/1013/hz0805e601r-10-1013170.pdf?src-supplier=Digi-Key, ComponentLink3Description=https://datasheet.ciiva.com/8512/hz0805e601r-10-a-vp-8512772.pdf?src-supplier=Avnet, ComponentLink3URL=https://datasheet.ciiva.com/8512/hz0805e601r-10-a-vp-8512772.pdf?src-supplier=Avnet, ComponentLink4Description=https://datasheet.ciiva.com/16714/70065439-16714006.pdf?src-supplier=Allied+Electronics, ComponentLink4URL=https://datasheet.ciiva.com/16714/70065439-16714006.pdf?src-supplier=Allied+Electronics, Contact Plating=Tin,Matte, Core Material=Ferrite, Depth=1.45mm, Height=1.25mm, Impedance=600R, Lead Free="Lead Free", Length=2mm, Material=Ferrite, Max Current Rating=500mA, Max DC Current=500mA, Mount="Surface Mount", Number of Lines=1, Packaging="Tape and Reel", Pricing 1="1=0,18000, 10=0,14400, 25=0,11200, 50=0,09280, 100=0,07990, 250=0,06396, 500=0,05754, 1000=0,04796 (USD)", REACH SVHC=Unknown, RoHS=Yes, Stock 1=2783878, Supplier 1=Digi-Key, Termination=SMD/SMT, Test Frequency=100MHz, Weight=0.00392oz, Width=0.049inch
FB42: library part Ferrite, "Ind Chip Bead 120Ohm 25% 100MHz Ferrite 3A 0603 Paper T/R", Case Code (Imperial)=0603, Case Code (Metric)=1608, Current Rating=3A, DC Resistance (DCR)=25mR, Frequency=100MHz, Manufacturer=Murata, Manufacturer Part Number=BLM18SG121TN1D, Max Operating Temperature=125°C, Min Operating Temperature=-55°C, Package Quantity=1, Supplier Part Number 1=1515752, Tolerance=25%, Case/Package=0603, Category="Ferrite Beads and Chips", ComponentLink1Description=https://datasheet.ciiva.com/1012/l0110s0100blm18s-1012624.pdf?src-supplier=Digi-Key, ComponentLink1URL=https://datasheet.ciiva.com/1012/l0110s0100blm18s-1012624.pdf?src-supplier=Digi-Key, ComponentLink2Description=https://datasheet.ciiva.com/18093/getdatasheetpartid-295885-18093249.pdf?src-supplier=Verical, ComponentLink2URL=https://datasheet.ciiva.com/18093/getdatasheetpartid-295885-18093249.pdf?src-supplier=Verical, ComponentLink3Description=https://datasheet.ciiva.com/11799/0900766b811b5866-11799181.pdf?src-supplier=RSComponents, ComponentLink3URL=https://datasheet.ciiva.com/11799/0900766b811b5866-11799181.pdf?src-supplier=RSComponents, ComponentLink4Description=https://datasheet.ciiva.com/41449/001171723-da-01-en-chip-drossel0603-120r-3000ma-1-6x0-8mm-41449353.pdf?src-supplier=Conrad, ComponentLink4URL=https://datasheet.ciiva.com/41449/001171723-da-01-en-chip-drossel0603-120r-3000ma-1-6x0-8mm-41449353.pdf?src-supplier=Conrad, ComponentLink5Description=https://datasheet.ciiva.com/41449/001172312-da-01-en-drossel-0603-120r-1-6x0-8mm-10000st-41449675.pdf?src-supplier=Conrad, ComponentLink5URL=https://datasheet.ciiva.com/41449/001172312-da-01-en-drossel-0603-120r-1-6x0-8mm-10000st-41449675.pdf?src-supplier=Conrad, ComponentLink6Description=https://datasheet.ciiva.com/1012/l0110s0100blm18s-1012625.pdf?src-supplier=Digi-Key, ComponentLink6URL=https://datasheet.ciiva.com/1012/l0110s0100blm18s-1012625.pdf?src-supplier=Digi-Key, ComponentLink7Description=https://datasheet.ciiva.com/8021/5151-8021511.pdf?src-supplier=Element14, ComponentLink7URL=https://datasheet.ciiva.com/8021/5151-8021511.pdf?src-supplier=Element14, ComponentLink8Description=https://datasheet.ciiva.com/8021/5151-8021512.pdf?src-supplier=Element14, ComponentLink8URL=https://datasheet.ciiva.com/8021/5151-8021512.pdf?src-supplier=Element14, ComponentLink9Description=https://datasheet.ciiva.com/14122/blm-series-eng-tds-14122906.pdf?src-supplier=Distrelec, ComponentLink9URL=https://datasheet.ciiva.com/14122/blm-series-eng-tds-14122906.pdf?src-supplier=Distrelec, ComponentLink10Description=https://datasheet.ciiva.com/16395/l0110s0100blm18s-16395498.pdf?src-supplier=Future+Electronics, ComponentLink10URL=https://datasheet.ciiva.com/16395/l0110s0100blm18s-16395498.pdf?src-supplier=Future+Electronics, ComponentLink11Description=https://datasheet.ciiva.com/1012/l0110s0100blm18s-1012623.pdf?src-supplier=Digi-Key, ComponentLink11URL=https://datasheet.ciiva.com/1012/l0110s0100blm18s-1012623.pdf?src-supplier=Digi-Key, ComponentLink12Description=https://datasheet.ciiva.com/17246/l0110s0100blm18s-17246943.pdf?src-supplier=Avnet+Europe, ComponentLink12URL=https://datasheet.ciiva.com/17246/l0110s0100blm18s-17246943.pdf?src-supplier=Avnet+Europe, Core Material=Ferrite, Depth=0.8mm, Height=0.8mm, Impedance=120R, Lead Free="Lead Free", Length=1.6mm, Material=Steel,Ferrite, Max Current Rating=3A, Max DC Current=3A, Number of Circuits=1, Number of Lines=1, Number of Pins=2, Packaging="Tape and Reel", REACH SVHC="No SVHC", RoHS=Yes, Shielding=Unshielded, Stock 1=47191, Supplier 1=Farnell, Termination=SMD/SMT, Test Frequency=100MHz, Width=0.8mm
FID1 FID2 FID3 FID4 FID5 FID6 FID7 FID8: library part Fid
J1_PCIE0 J1_PCIE1 J1_PCIE2 J1_PCIE3 J1_PCIE4: "PCI Express / PCI Connectors Mini PCI-E 6.8H G/F", Flammability Rating="UL94 V-0", High Temperature Housing=Yes, Housing Color=Black, Manufacturer="TE Connectivity AMP", Max Operating Temperature=85°C, Min Operating Temperature=-55°C, Package Quantity=450, Supplier Part Number 1=A125147CT-ND, Category="Card Edge Connectors", ComponentLink1Description=https://www.mouser.com/ds/2/418/NG_DS_8-1773459-7_EXPRESS_MINI_CARD_QRG_0816-907003.pdf?src-supplier=Mouser, ComponentLink1URL=https://www.mouser.com/ds/2/418/NG_DS_8-1773459-7_EXPRESS_MINI_CARD_QRG_0816-907003.pdf?src-supplier=Mouser, ComponentLink2Description=https://www.te.com/commerce/DocumentDelivery/DDEController?Action=srchrtrv&DocNm=108-99102&DocType=SS&DocLang=EN&src-supplier=Digi-Key, ComponentLink2URL=https://www.te.com/commerce/DocumentDelivery/DDEController?Action=srchrtrv&DocNm=108-99102&DocType=SS&DocLang=EN&src-supplier=Digi-Key, ComponentLink3Description=https://www.te.com/commerce/DocumentDelivery/DDEController?Action=srchrtrv&amp;DocNm=2041262&amp;DocType=Customer+Drawing&amp;DocLang=English&src-supplier=Digi-Key, ComponentLink3URL=https://www.te.com/commerce/DocumentDelivery/DDEController?Action=srchrtrv&amp;DocNm=2041262&amp;DocType=Customer+Drawing&amp;DocLang=English&src-supplier=Digi-Key, ComponentLink4Description=http://www.te.com/commerce/DocumentDelivery/DDEController?Action=srchrtrv&DocNm=2041262&DocType=Customer+Drawing&DocLang=English&src-supplier=Digi-Key, ComponentLink4URL=http://www.te.com/commerce/DocumentDelivery/DDEController?Action=srchrtrv&DocNm=2041262&DocType=Customer+Drawing&DocLang=English&src-supplier=Digi-Key, ComponentLink5Description=http://www.te.com/commerce/DocumentDelivery/DDEController?Action=showdoc&DocId=Customer+Drawing%7F2041262%7FC%7Fpdf%7FEnglish%7FENG_CD_2041262_C.pdf&src-supplier=Avnet, ComponentLink5URL=http://www.te.com/commerce/DocumentDelivery/DDEController?Action=showdoc&DocId=Customer+Drawing%7F2041262%7FC%7Fpdf%7FEnglish%7FENG_CD_2041262_C.pdf&src-supplier=Avnet, Connector Type=Receptacle, Contact Material="Copper Alloy", Contact Plating=Gold, ELV=Compliant, Housing Material=Thermoplastic, Lead Free="Lead Free", Manufacturer Part Number=2041262-1, Mount="Surface Mount", Number of Contacts=52, Number of Pins=52, Number of Positions=52, Number of Rows=2, Orientation="Right Angle", Packaging="Tape and Reel", PCB Mount Retention=Without, PCB Mounting Orientation=Horizontal, Pitch=0.8mm, Pricing 1="1=1,04000, 10=0,91200, 25=0,85840, 50=0,82260, 100=0,78680 (USD)", RoHS=Yes, Row Spacing=0.031inch, Stack Height=0.268inch, Stackable=No, Stock 1=33744, Supplier 1=Digi-Key, Termination=Solder
J2 J3 J4 J5 J6 J7: "Ultra Miniature Coaxial Connector Jack, 60 V, 50 Ohm, -40 to 90 degC, RoHS, Tape and Reel", Maximum Frequency="6 GHz", Operating Temperature Range="- 40 C to + 90 C", Supplier Part Number 1=62X0488, Body Material="Liquid Crystal Polymer (LCP)", Brand="TE Connectivity / AMP", ComponentLink1Description="Manufacturer URL", ComponentLink1URL=http://www.te.com, ComponentLink2Description=Datasheet, ComponentLink2URL=http://www.te.com/commerce/DocumentDelivery/DDEController?Action=srchrtrv&DocNm=1909763&DocType=Customer+Drawing&DocLang=English, Contact Material="Copper Alloy", Contact Plating=Gold, DatasheetVersion="Rev. B2", Factory Pack Quantity=5000, Gender="Jack (Female)", Impedance="50 Ohms", Mounting Technology="Surface Mount", Orientation=Straight, PackageDescription="3-Pin Surface Mount Device, Body 2.6 x 2.6 mm", PackageReference=SMD, Packaging=Reel, Product=Connectors, Product Category="RF Connectors / Coaxial Connectors", RF Series=UMCC, RoHS=Details, Supplier 1=Newark, Supplier 2=Farnell, Supplier 3=Digi-Key, Supplier 4=Digi-Key, Supplier 5=Digi-Key, Supplier Part Number 2=2781689, Supplier Part Number 3=A118077TR-ND, Supplier Part Number 4=A118077CT-ND, Supplier Part Number 5=A118077DKR-ND
J12 J13 J15 J16 J17 J19 J20 J21 J22 J23 J24 J29 J30 J36: library part "2 Pin", Color=White, Contact Resistance=20mR, Current Rating=4A, Flammability Rating="UL94 V-0", Housing Color=Natural, Insulation Resistance=50GR, Manufacturer=Molex, Manufacturer Part Number=22-27-2021, Max Operating Temperature=75°C, Min Operating Temperature=0°C, Package Quantity=24000, Supplier Part Number 1=0022272021, Voltage Rating=250V, Approvals=UL,CSA, Category="Headers and Wire Housings", ComponentLink1Description=https://datasheet.ciiva.com/9468/0022272021-pcb-headers-9468403.pdf?src-supplier=Avnet, ComponentLink1URL=https://datasheet.ciiva.com/9468/0022272021-pcb-headers-9468403.pdf?src-supplier=Avnet, ComponentLink2Description=https://datasheet.ciiva.com/30177/113940022272021-pcb-headers-30177601.pdf?src-supplier=Onlinecomponents.com, ComponentLink2URL=https://datasheet.ciiva.com/30177/113940022272021-pcb-headers-30177601.pdf?src-supplier=Onlinecomponents.com, ComponentLink3Description=https://datasheet.ciiva.com/15217/getdatasheetpartid-163454-15217683.pdf?src-supplier=Verical, ComponentLink3URL=https://datasheet.ciiva.com/15217/getdatasheetpartid-163454-15217683.pdf?src-supplier=Verical, ComponentLink4Description=https://datasheet.ciiva.com/5154/0022272021-pcb-headers-227458-5154933.pdf?src-supplier=Mouser, ComponentLink4URL=https://datasheet.ciiva.com/5154/0022272021-pcb-headers-227458-5154933.pdf?src-supplier=Mouser, ComponentLink5Description=https://datasheet.ciiva.com/11746/0900766b804624e4-11746551.pdf?src-supplier=RSComponents, ComponentLink5URL=https://datasheet.ciiva.com/11746/0900766b804624e4-11746551.pdf?src-supplier=RSComponents, ComponentLink6Description=https://datasheet.ciiva.com/19462/879254-19462349.pdf?src-supplier=Jameco, ComponentLink6URL=https://datasheet.ciiva.com/19462/879254-19462349.pdf?src-supplier=Jameco, ComponentLink7Description=https://datasheet.ciiva.com/25908/0022272021-pcb-headers-25908245.pdf?src-supplier=Avnet+Europe, ComponentLink7URL=https://datasheet.ciiva.com/25908/0022272021-pcb-headers-25908245.pdf?src-supplier=Avnet+Europe, ComponentLink8Description=https://datasheet.ciiva.com/20207/22-0838e-20207111.pdf?src-supplier=Rapid+Electronics, ComponentLink8URL=https://datasheet.ciiva.com/20207/22-0838e-20207111.pdf?src-supplier=Rapid+Electronics, Contact Gender=Male, Contact Material=Brass,Tin, Contact Plating=Tin,Copper, Depth=5.8mm, Gender=Male, Height=11.7mm, Housing Material=Nylon, Lead Free="Lead Free", Lead Pitch=2.54mm, Length=10.16mm, Material=Nylon, Max Current Rating=4A, Mount="Through Hole", Number of Circuits=2, Number of Contacts=2, Number of Positions=2, Number of Rows=1, Orientation=Straight, Packaging=Bulk, Pitch=2.54mm, Pricing 1="1=0,12370, 10=0,11289, 30=0,10755, 50=0,10087, 100=0,09486 (USD)", Radiation Hardening=No, REACH SVHC=Unknown, RoHS=Yes, Stock 1=3474, Supplier 1=Avnet, Termination=Solder, Voltage Rating (AC)=250V, Voltage Rating (DC)=250V, Working Voltage=250V